# Altium PCB Game_Controller.PcbDoc
Units mm, origin at the board's own origin, x right, y up, seen from the top; angles counter-clockwise.
Board outline 125.68 x 44.82 mm, 2 copper layers (Top Layer, Bottom Layer); 110 components, 52 nets, 298 pads, 85 vias.
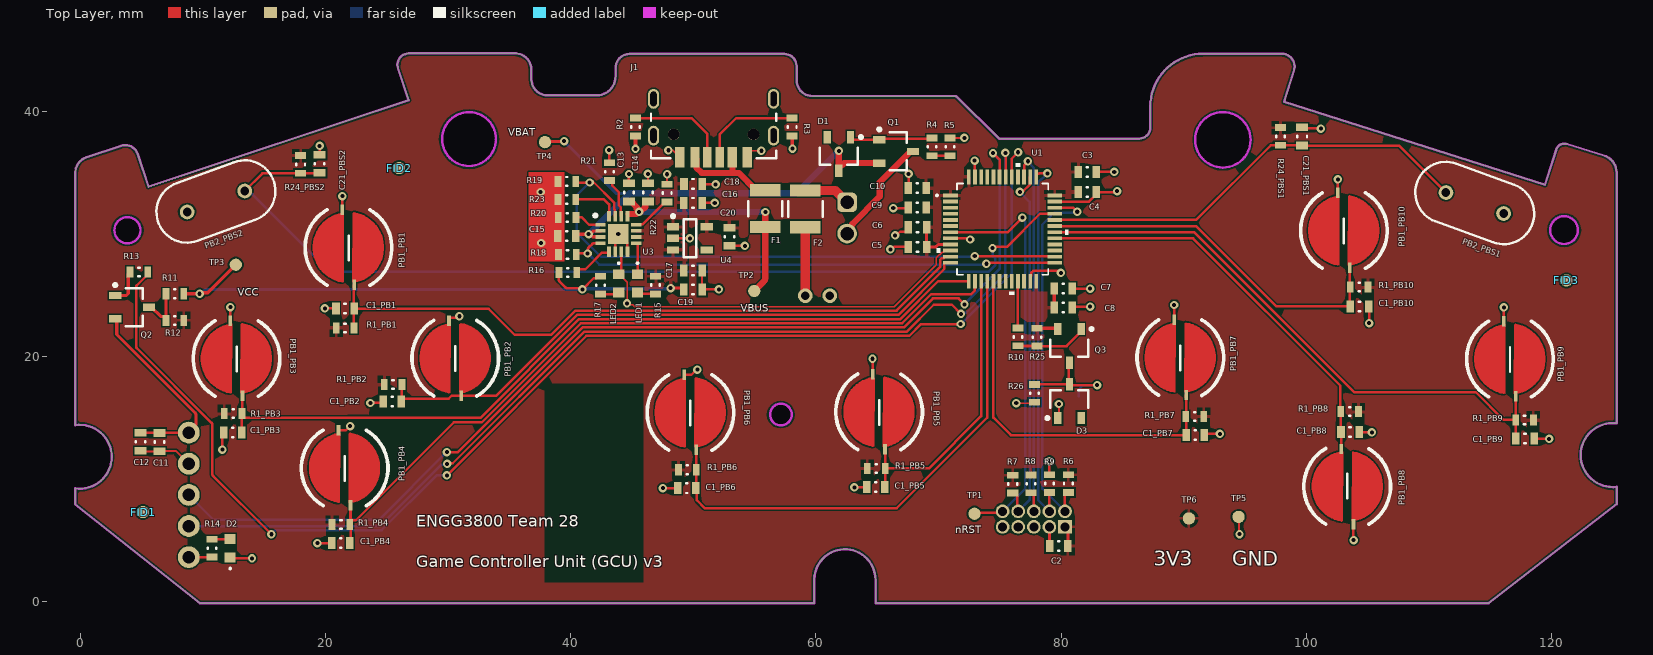
[diagram p0: Top Layer view]
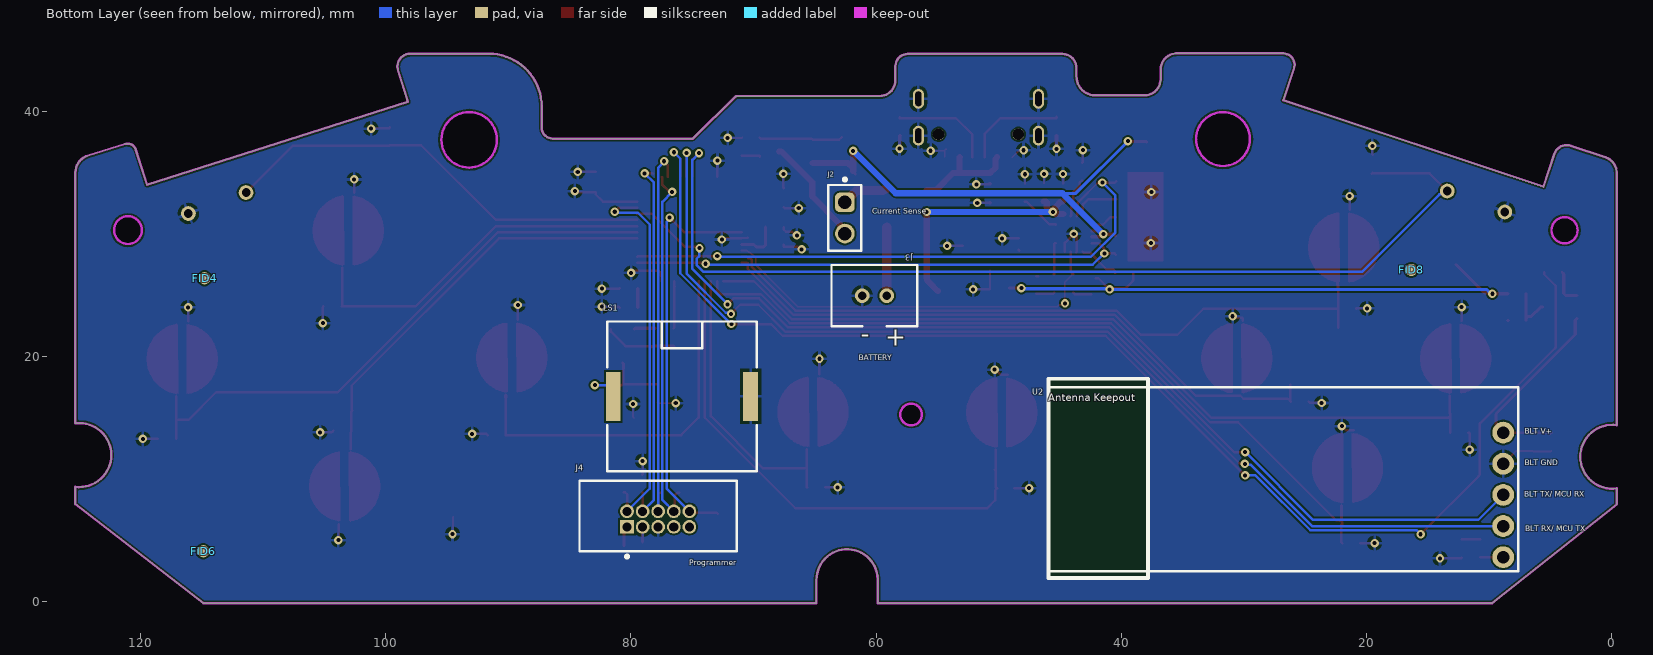
[diagram p1: Bottom Layer view, seen from below]
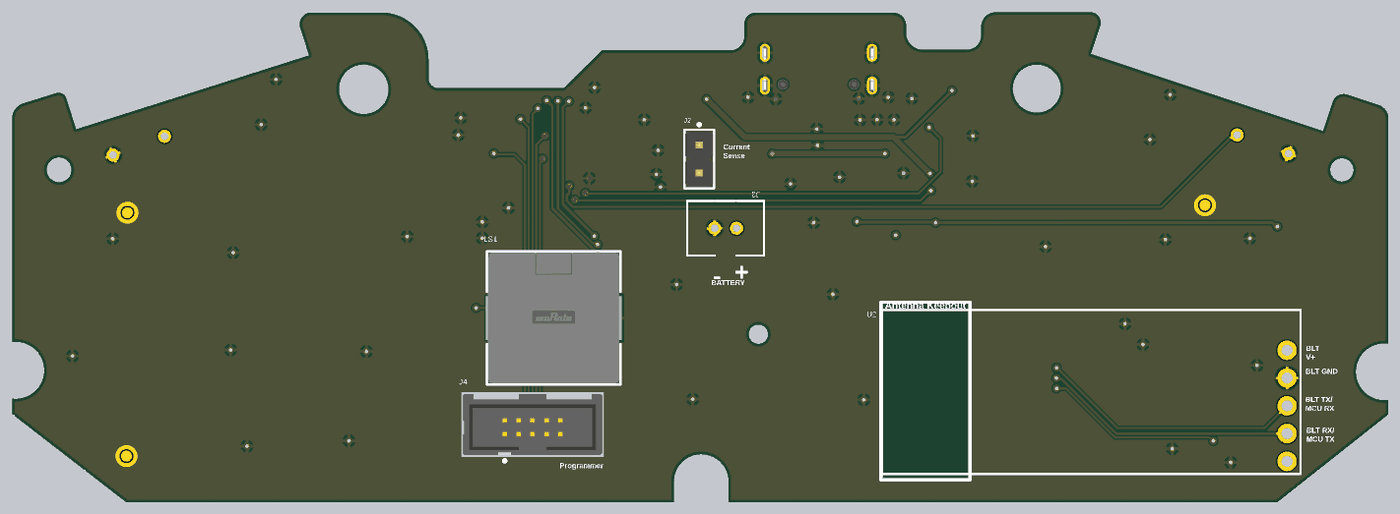
[diagram p2: 3D render of the assembled board from below, using the file's embedded part models]

## Layer stack, top to bottom
Top Solder: solder mask 0.0102, Solder Resist, Dk 3.5
Top Layer: signal copper 0.0356
Dielectric 1: dielectric 0.32, FR-4, Dk 4.8
Bottom Layer: signal copper 0.0356
Bottom Solder: solder mask 0.0102, Solder Resist, Dk 3.5

## Board outline
-0.382,7.932 -0.382,9.245 -0.373,9.251 ccw(c-0.015,11.823) 2.582,11.823 ccw(c-0.015,11.823) -0.373,14.395 -0.382,14.402 -0.382,34.989 -0.382,34.99 cw(c0.934,34.989) 0.519,36.238 3.367,37.183 cw(c3.699,36.182) 4.7,36.514 5.583,33.856 26.786,40.895 25.927,43.483 cw(c26.818,43.779) 26.818,44.718 35.478,44.718 cw(c35.478,43.391) 36.805,43.391 36.805,42.611 ccw(c38.123,42.611) 38.123,41.292 42.125,41.292 ccw(c42.125,42.83) 43.662,42.83 43.662,43.515 cw(c44.817,43.515) 44.817,44.67 57.429,44.67 cw(c57.429,43.668) 58.43,43.668 58.43,42.518 ccw(c59.709,42.518) 59.709,41.24 71.414,41.24 71.419,41.238 74.946,37.77 86.365,37.77 ccw(c86.365,38.676) 87.271,38.676 87.271,40.379 cw(c91.583,40.379) 91.583,44.691 97.984,44.691 cw(c97.984,43.639) 99.037,43.639 cw(c97.984,43.639) 98.987,43.321 98.177,40.77 119.453,34.01 120.358,36.857 cw(c121.047,36.639) 121.263,37.328 124.264,36.387 cw(c123.824,34.984) 125.295,34.985 125.296,34.984 125.296,14.559 125.286,14.553 ccw(c124.973,11.964) 125.287,9.374 125.296,9.368 125.296,7.975 125.292,7.969 114.868,-0.104 114.863,-0.106 64.87,-0.106 64.863,-0.098 64.863,1.794 ccw(c62.366,1.786) 59.87,1.851 59.87,-0.098 59.864,-0.106 9.765,-0.106 9.76,-0.103
cut-out: 90.923,37.669 ccw(c93.187,37.669) 93.187,35.405 ccw(c93.187,37.669) 95.451,37.669 ccw(c93.187,37.669) 93.187,39.933 ccw(c93.187,37.669)
cut-out: 119.878,30.303 ccw(c121.01,30.303) 121.01,29.171 ccw(c121.01,30.303) 122.142,30.303 ccw(c121.01,30.303) 121.01,31.435 ccw(c121.01,30.303)
cut-out: 2.799,30.293 ccw(c3.865,30.293) 3.865,29.227 ccw(c3.865,30.293) 4.93,30.293 ccw(c3.865,30.293) 3.865,31.358 ccw(c3.865,30.293)
cut-out: 56.263,15.264 ccw(c57.146,15.264) 57.146,14.381 ccw(c57.146,15.264) 58.029,15.264 ccw(c57.146,15.264) 57.146,16.147 ccw(c57.146,15.264)
cut-out: 29.521,37.73 ccw(c31.718,37.73) 31.718,35.533 ccw(c31.718,37.73) 33.916,37.73 ccw(c31.718,37.73) 31.718,39.928 ccw(c31.718,37.73)

## Design rules (kind name [scope] priority, off if disabled: settings)
Clearance [All] p1: gap=0.14 ignorepadtopadclearanceinfootprint=FALSE
MinimumSolderMaskSliver [All] p1: minsoldermaskwidth=0.102
NetAntennae [NOT(InComponent('PB1_PB1') OR InComponent('PB1_PB2') OR InComponent('PB1_PB3') OR InComponent('PB1_PB4') OR InComponent('PB1_PB5') OR InComponent('PB1_PB6') OR InComponent('PB1_PB7') OR InComponent('PB1_PB8') OR InComponent('PB1_PB9') OR InComponent('PB1_PB10') OR InComponent('PB3_PBS1') OR InComponent('PB3_PBS2'))] p1: netantennaetolerance=0
PolygonConnect [All] p1: connectstyle=Relief reliefconductorwidth=0.254 reliefentries=4 polygonreliefangle="90 Angle" airgapwidth=0.254
RoutingVias [All] p1: holewidth=0.33 width=0.686 viastyle="Through Hole" minholewidth=0.33 minwidth=0.686 maxholewidth=0.33 maxwidth=0.686
SolderMaskExpansion SolderMaskExpansionViaTent [IsVia] p1: expansion=0.102 istentingtop=TRUE
SolderMaskExpansion [All] p2: expansion=0.102 istentingtop=FALSE
SupplyNets "Schematic Supply Nets_4" [InNet('+3V3')] p1: voltage=0.000
SupplyNets "Schematic Supply Nets_3" [InNet('V_BAT')] p2: voltage=0.000
SupplyNets "Schematic Supply Nets_2" [InNet('GND')] p3: voltage=0.000
SupplyNets "Schematic Supply Nets_1" [InNet('V_BUS')] p4: voltage=0.000
SupplyNets "Schematic Supply Nets" [InNet('VCC')] p5: voltage=0.000
Width [All] p1: maxlimit=2.54 minlimit=0.152 preferedwidth=0.203
28 further rules are at their usual default settings.

## Classes and differential pairs
component class Buzzer: D3 LS1 Q3 R25 R26
channel class SNES_Shoulder_Button: PBS1 PBS2
net class SNES_AUX_PB[1..2]: SNES_AUX_PB1 SNES_AUX_PB2
component class PBS2: C21_PBS2 PB2_PBS2 R24_PBS2
component class PBS1: C21_PBS1 PB2_PBS1 R24_PBS1
component class Control: C2 C3 C4 C5 C6 C7 C8 C9 C10 J4 R6 R7 R8 R9 R10 TP1 U1
component class Charger: C13 C14 C15 C16 C17 C18 C19 C20 LED1 LED2 R15 R16 R17 R18 R19 R20 R21 R22 R23 TP2 TP3 TP4 TP5 TP6 U3 U4
component class Bluetooth: C11 C12 D2 Q2 R11 R12 R13 R14 U2
channel class Push_Button: PB1 PB2 PB3 PB4 PB5 PB6 PB7 PB8 PB9 PB10
net class SNES_PB[1..10]: SNES_PB1 SNES_PB2 SNES_PB3 SNES_PB4 SNES_PB5 SNES_PB6 SNES_PB7 SNES_PB8 SNES_PB9 SNES_PB10
component class PB10: C1_PB10 PB1_PB10 R1_PB10
component class PB9: C1_PB9 PB1_PB9 R1_PB9
component class PB8: C1_PB8 PB1_PB8 R1_PB8
component class PB7: C1_PB7 PB1_PB7 R1_PB7
component class PB6: C1_PB6 PB1_PB6 R1_PB6
component class PB5: C1_PB5 PB1_PB5 R1_PB5
component class PB4: C1_PB4 PB1_PB4 R1_PB4
component class PB3: C1_PB3 PB1_PB3 R1_PB3
component class PB2: C1_PB2 PB1_PB2 R1_PB2
component class PB1: C1_PB1 PB1_PB1 R1_PB1
component class Game_Controller: D1 F1 F2 FID1 FID2 FID3 FID6 J1 J2 J3 Q1 R2 R3 R4 R5

## Components (designator, comment, footprint, x,y, rotation, side; value= is the part's Value field where it differs from the comment)
C1_PB1 "0.1 uF ± 5% / 50V X7R  / 0603" 0603_CAP 21.609,23.898 r180 top (schematic designator C1)
C1_PB2 "0.1 uF ± 5% / 50V X7R  / 0603" 0603_CAP 25.468,16.315 r180 top (schematic designator C1)
C1_PB3 "0.1 uF ± 5% / 50V X7R  / 0603" 0603_CAP 12.447,13.798 r180 top (schematic designator C1)
C1_PB4 "0.1 uF ± 5% / 50V X7R  / 0603" 0603_CAP 21.258,4.784 r180 top (schematic designator C1)
C1_PB5 "0.1 uF ± 5% / 50V X7R  / 0603" 0603_CAP 64.892,9.343 r180 top (schematic designator C1)
C1_PB6 "0.1 uF ± 5% / 50V X7R  / 0603" 0603_CAP 49.471,9.258 r180 top (schematic designator C1)
C1_PB7 "0.1 uF ± 5% / 50V X7R  / 0603" 0603_CAP 90.934,13.588 r0 top (schematic designator C1)
C1_PB8 "0.1 uF ± 5% / 50V X7R  / 0603" 0603_CAP 103.559,13.845 r0 top (schematic designator C1)
C1_PB9 "0.1 uF ± 5% / 50V X7R  / 0603" 0603_CAP 117.822,13.302 r0 top (schematic designator C1)
C1_PB10 "0.1 uF ± 5% / 50V X7R  / 0603" 0603_CAP 104.328,24.077 r0 top (schematic designator C1)
C2 "1 uF ± 10%  / 16V X7R  / 0603" 0603_CAP 79.803,4.551 r180 top
C3 "0.1 uF ± 5% / 50V X7R  / 0603" 0603_CAP 82.134,35.059 r0 top
C4 "0.1 uF ± 5% / 50V X7R  / 0603" 0603_CAP 82.134,33.408 r0 top
C5 "0.1 uF ± 5% / 50V X7R  / 0603" 0603_CAP 68.287,28.938 r180 top
C6 "1 uF ± 10%  / 16V X7R  / 0603" 0603_CAP 68.287,30.538 r180 top
C7 "0.1 uF ± 5% / 50V X7R  / 0603" 0603_CAP 80.178,25.559 r0 top
C8 "4.7 uF ± 10%  / 10V X5R  / 0603" 0603_CAP 80.178,23.985 r0 top
C9 "0.1 uF ± 5% / 50V X7R  / 0603" 0603_CAP 68.265,32.163 r180 top
C10 "4.7 uF ± 10%  / 10V X5R  / 0603" 0603_CAP 68.265,33.738 r180 top
C11 "0.1 uF ± 5% / 50V X7R  / 0603" 0603_CAP 6.471,13.021 r270 top
C12 "1 uF ± 10%  / 16V X7R  / 0603" 0603_CAP 4.928,13.05 r270 top
C13 "0.1 uF ± 5% / 50V X7R  / 0603" 0603_CAP 44.752,33.379 r90 top
C14 "1 uF ± 10%  / 16V X7R  / 0603" 0603_CAP 46.327,33.376 r90 top
C15 "4.7 uF ± 10%  / 10V X5R  / 0603" 0603_CAP 39.696,29.816 r180 top
C16 "4.7 uF ± 10%  / 10V X5R  / 0603" 0603_CAP 49.983,32.533 r0 top
C17 "0.1 uF ± 5% / 50V X7R  / 0603" 0603_CAP 49.983,27.022 r0 top
C18 "10 uF ± 20%  / 10V X5R  / 0603" 0603_CAP 49.983,34.083 r0 top
C19 "10 uF ± 20%  / 10V X5R  / 0603" 0603_CAP 49.983,25.472 r0 top
C20 "4.7 uF ± 10%  / 10V X5R  / 0603" 0603_CAP 52.955,29.765 r270 top
C21_PBS1 "0.1 uF ± 5% / 50V X7R  / 0603" 0603_CAP 99.656,37.941 r90 top (schematic designator C21)
C21_PBS2 "0.1 uF ± 5% / 50V X7R  / 0603" 0603_CAP 19.518,35.708 r90 top (schematic designator C21)
D1 "5.6V Zener Diode" SOT23-3 61.873,36.511 r270 top
D2 "LED GREEN" LED 12.423,4.157 r270 top
D3 "5.6V Zener Diode" SOT23-3 80.678,16.354 r90 top
F1 "1210L050YR" FP-1210L050YR-MFG 55.87,32.053 r270 top
F2 "1210L050YR" FP-1210L050YR-MFG 59.144,32.032 r90 top
FID1 "FID" Fiducial#1 5.161,7.311 r90 top
FID2 "FID" Fiducial#1 26.041,35.361 r90 top
FID3 "FID" Fiducial#1 121.229,26.204 r90 top
FID4 "FID" Fiducial#2 114.789,26.383 r90 top
FID6 "FID" Fiducial#2 114.879,4.115 r90 top
FID8 "FID" Fiducial#2 16.387,27.061 r90 top (schematic designator FID6)
J1 "217176-0001" FP-217176-0001-MFG 51.658,40.182 r180 top
J2 "61300211121" 61300211121 62.551,31.294 r270 bottom
J3 "Molex Connector" B2B-PH-K-S 59.139,24.96 r0 bottom
J4 "10 Pin Header" SHF-105-01-L-D-TH 78.532,7.633 r180 bottom
LED1 "LED GREEN" LED 45.284,26.163 r90 top
LED2 "LED RED" LED 43.75,26.163 r90 top
LS1 "PKLCS1212E2000-R1" FP-PKLCS1212E2000-R1-MFG 75.837,16.754 r180 bottom
PB1_PB1 "NES Pushbutton" SNES_PB 21.893,28.906 r0 top (schematic designator PB1)
PB1_PB2 "NES Pushbutton" SNES_PB 30.602,19.88 r0 top (schematic designator PB1)
PB1_PB3 "NES Pushbutton" SNES_PB 12.769,19.857 r0 top (schematic designator PB1)
PB1_PB4 "NES Pushbutton" SNES_PB 21.582,10.934 r0 top (schematic designator PB1)
PB1_PB5 "NES Pushbutton" SNES_PB 65.163,15.508 r0 top (schematic designator PB1)
PB1_PB6 "NES Pushbutton" SNES_PB 49.772,15.452 r0 top (schematic designator PB1)
PB1_PB7 "NES Pushbutton" SNES_PB 89.723,19.93 r0 top (schematic designator PB1)
PB1_PB8 "NES Pushbutton" SNES_PB 103.319,9.385 r180 top (schematic designator PB1)
PB1_PB9 "NES Pushbutton" SNES_PB 116.6,19.817 r0 top (schematic designator PB1)
PB1_PB10 "NES Pushbutton" SNES_PB 103.062,30.29 r0 top (schematic designator PB1)
PB2_PBS1 "NES  Shoulder Pushbutton" SHOULDER_PB 116.075,31.659 r160 top (schematic designator PB2)
PB2_PBS2 "NES  Shoulder Pushbutton" SHOULDER_PB 8.731,31.784 r20 top (schematic designator PB2)
Q1 "P Channel MOSFET" SOT23-3 66.547,36.72 r0 top
Q2 "P Channel MOSFET" SOT23-3 4.246,24.026 r0 top
Q3 "P Channel MOSFET" SOT23-3 80.676,20.858 r270 top
R1_PB1 "10k ± 0.5% / 100 mW  / 0603" 0603_RES 21.609,22.324 r180 top (schematic designator R1)
R1_PB2 "10k ± 0.5% / 100 mW  / 0603" 0603_RES 25.525,17.712 r180 top (schematic designator R1)
R1_PB3 "10k ± 0.5% / 100 mW  / 0603" 0603_RES 12.48,15.342 r180 top (schematic designator R1)
R1_PB4 "10k ± 0.5% / 100 mW  / 0603" 0603_RES 21.274,6.296 r180 top (schematic designator R1)
R1_PB5 "10k ± 0.5% / 100 mW  / 0603" 0603_RES 64.923,10.878 r180 top (schematic designator R1)
R1_PB6 "10k ± 0.5% / 100 mW  / 0603" 0603_RES 49.521,10.766 r180 top (schematic designator R1)
R1_PB7 "10k ± 0.5% / 100 mW  / 0603" 0603_RES 90.894,15.112 r0 top (schematic designator R1)
R1_PB8 "10k ± 0.5% / 100 mW  / 0603" 0603_RES 103.521,15.501 r0 top (schematic designator R1)
R1_PB9 "10k ± 0.5% / 100 mW  / 0603" 0603_RES 117.785,14.826 r0 top (schematic designator R1)
R1_PB10 "10k ± 0.5% / 100 mW  / 0603" 0603_RES 104.295,25.655 r0 top (schematic designator R1)
R2 "5.1k ± 1% / 100 mW  / 0603" 0603_RES 45.298,38.712 r90 top
R3 "5.1k ± 1% / 100 mW  / 0603" 0603_RES 58.072,38.712 r90 top
R4 "46.4k ± 0.1% / 100 mW  / 0603" 0603_RES 69.477,37.096 r270 top
R5 "46.4k ± 0.1% / 100 mW  / 0603" 0603_RES 70.95,37.096 r90 top
R6 "10k ± 0.5% / 100 mW  / 0603" 0603_RES 80.584,9.639 r90 top
R7 "10k ± 0.5% / 100 mW  / 0603" 0603_RES 76.054,9.601 r90 top
R8 "10k ± 0.5% / 100 mW  / 0603" 0603_RES 77.536,9.614 r90 top
R9 "10k ± 0.5% / 100 mW  / 0603" 0603_RES 79.06,9.639 r270 top
R10 "1.13k ± 1% / 100 mW  / 0603" 0603_RES 76.496,21.592 r90 top
R11 "0R ± 1% / 25 mW  / 0204" 0603_RES 7.727,25.116 r0 top
R12 "0R ± 1% / 25 mW  / 0204" 0603_RES 7.727,22.948 r0 top
R13 "1.13k ± 1% / 100 mW  / 0603" 0603_RES 4.805,26.881 r0 top
R14 "1.13k ± 1% / 100 mW  / 0603" 0603_RES 10.747,4.371 r270 top
R15 "1.13k ± 1% / 100 mW  / 0603" 0603_RES 46.938,25.828 r270 top
R16 "10k ± 0.5% / 100 mW  / 0603" 0603_RES 39.772,26.844 r0 top
R17 "1.13k ± 1% / 100 mW  / 0603" 0603_RES 42.443,25.816 r270 top
R18 "10k ± 0.5% / 100 mW  / 0603" 0603_RES 39.746,28.311 r0 top
R19 "10k ± 0.5% / 100 mW  / 0603" 0603_RES 39.696,34.286 r0 top
R20 "10k ± 0.5% / 100 mW  / 0603" 0603_RES 39.722,31.34 r0 top
R21 "46.4k ± 0.1% / 100 mW  / 0603" 0603_RES 43.178,35.071 r90 top
R22 "1.18k ± 1% / 100 mW  / 0603" 0603_RES 47.876,33.325 r270 top
R23 "1.13k ± 1% / 100 mW  / 0603" 0603_RES 39.696,32.813 r0 top
R24_PBS1 "10k ± 0.5% / 100 mW  / 0603" 0603_RES 97.878,37.941 r90 top (schematic designator R24)
R24_PBS2 "10k ± 0.5% / 100 mW  / 0603" 0603_RES 17.996,35.661 r90 top (schematic designator R24)
R25 "10k ± 0.5% / 100 mW  / 0603" 0603_RES 78.045,21.574 r90 top
R26 "1.13k ± 1% / 100 mW  / 0603" 0603_RES 77.822,16.996 r270 top
TP1 "TEST POINT" "New footprint 1" 72.931,7.179 r90 top
TP2 "TEST POINT" "New footprint 1" 54.98,25.337 r90 top
TP3 "TEST POINT" "New footprint 1" 12.704,27.483 r90 top
TP4 "TEST POINT" "New footprint 1" 37.909,37.479 r90 top
TP5 "TEST POINT" "New footprint 1" 94.468,6.921 r90 top
TP6 "TEST POINT" "New footprint 1" 90.418,6.796 r90 top
U1 "STM32 Ultra Low Power MCU" LQFP48-7x7mm 75.733,30.258 r0 top locked
U2 "HC05" HC05 8.867,3.635 r90 bottom locked
U3 "Battery Management System" BQ24074RGTR 43.826,29.71 r0 top
U4 "IC REG LINEAR 3.3V 500MA" SOT23-5 49.729,29.638 r0 top

## Footprints (in the part's own frame and the unit in brackets; to place one, negate y for a bottom-side part, rotate by r counter-clockwise, add the part's x,y. Pads: shape width x height; smd on the part's side, far side on the other; paste and mask are expansions set on the pad)
0603_CAP [mm] "Chip Capacitor, 2-Leads, Body 1.55x0.85mm, IPC Medium Density"
  rect 0.62x0.98 smd: 1(-0.74,0) 2(0.74,0)
  silkscreen extent -0.05,-0.39 0.05,0.39, body extent -0.8,-0.45 0.8,0.45, height 0.55
0603_RES [mm] "Chip Resistor, 2-Leads, Body 1.55x0.85mm, IPC Medium Density"
  rect 0.55x0.9 smd: 1(-0.725,0) 2(0.725,0)
  silkscreen extent -0.05,-0.35 0.05,0.35, body extent -0.8,-0.45 0.8,0.45, height 0.55
61300211121 [mm] "Pin Header, pitch 2.54 mm, THT, Vertical, single row, 2p"
  rrect50% 1.6x1.6 hole 1.1: 1(-1.27,0)
  round 1.6 hole 1.1: 2(1.27,0)
  silkscreen extent -3.26,-1.35 2.69,1.35, body extent -2.54,-1.27 2.54,1.27, height 8.57
B2B-PH-K-S [mm]
  round 1.2 hole 0.7: 1(0,0) 2(2,0)
  silkscreen extent -2.5,-2.5 4.5,2.5
BQ24074RGTR [mm]
  rect 0.85x0.3 smd: 1(-1.389,1.033) 2(-1.389,0.533) 3(-1.389,0.033) 4(-1.389,-0.467) 9(1.511,-0.467) 10(1.511,0.033) 11(1.511,0.533) 12(1.511,1.033)
  rect 0.3x0.85 smd: 5(-0.689,-1.167) 6(-0.189,-1.167) 7(0.311,-1.167) 8(0.811,-1.167) 13(0.811,1.733) 14(0.311,1.733) 15(-0.189,1.733) 16(-0.689,1.733)
  rect 1.65x1.65 smd: 17(0.061,0.283)
  silkscreen extent -1.94,1.66 -1.69,1.91
Fiducial#1 [mm]
  round 1 smd paste-2539.97 mask-2539.97: 4(0,0.025)
Fiducial#2 [mm]
  round 1 smd far side paste-2539.97 mask-2539.97: 4(0,0.025)
FP-1210L050YR-MFG [mm]
  rect 1x2.5 smd paste+0 mask+0: 1(-1.5,0) 2(1.5,0)
  silkscreen extent -0.63,-1.4 0.63,1.4, body extent -1.61,-1.29 1.61,1.29, height 0.85
FP-217176-0001-MFG [mm]
  rrect100% 0.92x1.62 hole 1.2 slot 0.5 at 0 deg paste-2539.97 mask+0: 1(-4.895,2.175) 2(4.895,2.175) 3(-4.895,-0.825) 4(4.895,-0.825)
  rect 0.8x1.67 smd paste+0 mask+0: C1(-2.75,3.94) C6(2.75,3.94)
  rect 0.76x1.67 smd paste+0 mask+0: C2(-1.52,3.94) C5(1.52,3.94)
  rect 0.7x1.67 smd paste+0 mask+0: C3(-0.5,3.94) C4(0.5,3.94)
  round 0.95 hole 0.95 unplated paste-2539.97 mask+0: ""(-3.25,2.075) ""(3.25,2.075)
  silkscreen extent -5.1,0.4 5.1,4.02, body extent -5.32,-4.34 5.32,4.42, height 4.81
FP-PKLCS1212E2000-R1-MFG [mm]
  rect 1.2x4 smd paste+0 mask+0: 1(-5.6,0) 2(5.6,0)
  silkscreen extent -6.1,-6.1 6.1,6.1, body extent -6,-6 6,6, height 3.01
HC05 [mil]
  round 70 hole 40.16: 1(0,0) 2(100,0) 3(200,0) 4(300,0) 5(400,0)
  silkscreen extent -45,-48 545,1457
LED [mm]
  rect 0.8x0.9 smd: 1(-0.954,-0.178) 2(0.548,-0.178)
  silkscreen extent 1.42,-0.2 1.47,-0.15, body extent -1,-0.58 0.6,0.22, height 0.55
LQFP48-7x7mm [mil]
  rect 47x12 smd paste+0 mask+0: 1(-187.32,113.27) 2(-187.32,93.58) 3(-187.32,73.9) 4(-187.32,54.21) 5(-187.32,34.53) 6(-187.32,14.84) 7(-187.32,-4.84) 8(-187.32,-24.53) 9(-187.32,-44.21) 10(-187.32,-63.9) 11(-187.32,-83.58) 12(-187.32,-103.27) 25(147.32,-103.27) 26(147.32,-83.58) 27(147.32,-63.9) 28(147.32,-44.21) 29(147.32,-24.53) 30(147.32,-4.84) 31(147.32,14.84) 32(147.32,34.53) 33(147.32,54.21) 34(147.32,73.9) 35(147.32,93.58) 36(147.32,113.27)
  rect 12x47 smd paste+0 mask+0: 13(-128.27,-162.32) 14(-108.58,-162.32) 15(-88.9,-162.32) 16(-69.21,-162.32) 17(-49.53,-162.32) 18(-29.84,-162.32) 19(-10.16,-162.32) 20(9.53,-162.32) 21(29.21,-162.32) 22(48.9,-162.32) 23(68.58,-162.32) 24(88.27,-162.32) 37(88.27,172.32) 38(68.58,172.32) 39(48.9,172.32) 40(29.21,172.32) 41(9.53,172.32) 42(-10.16,172.32) 43(-29.84,172.32) 44(-49.53,172.32) 45(-69.21,172.32) 46(-88.9,172.32) 47(-108.58,172.32) 48(-128.27,172.32)
  silkscreen extent -234,-206 191,216, body extent -197,-172 157,182, height 63
"New footprint 1" [mm]
  round 1 smd: 0(0,0)
SHF-105-01-L-D-TH [mm]
  rect 1.12x1.12 hole 0.74 paste-2539.97 mask+0: 1(-1.778,-1.525)
  round 1.12 hole 0.74 paste-2539.97 mask+0: 2(-1.778,-0.255) 3(-0.508,-1.525) 4(-0.508,-0.255) 5(0.762,-1.525) 6(0.762,-0.255) 7(2.032,-1.525) 8(2.032,-0.255) 9(3.302,-1.525) 10(3.302,-0.255)
  silkscreen extent -5.65,-4.07 7.18,2.22, body extent -5.59,-3.43 7.11,2.16, height 5.46
SHOULDER_PB [mm]
  round 1.2 hole 0.7: 1(0,0) 2(5,0)
  silkscreen extent -2.5,-2.5 7.5,2.5
SNES_PB [mm]
  rect 0.3x0.85 smd: 1(-0.514,3.05) 2(0.477,-3.071)
  Top Layer region: -0.401,-2.841 -1.321,-2.509 -2.197,-1.839 -2.743,-0.722 -2.826,0.143 -2.708,0.872 -2.173,1.803 -1.733,2.2 -0.373,2.797
  Top Layer region: 0.338,2.762 1.233,2.438 2.109,1.768 2.655,0.652 2.738,-0.214 2.62,-0.942 2.085,-1.874 1.645,-2.271 0.31,-2.857
  Top Layer lines w0.203: -0.518,-2.781 cw(c-0.031,-0.023) -0.518,2.734
  Top Layer lines w0.254: 0.455,-2.781 ccw(c-0.031,-0.023) 0.455,2.734
  silkscreen extent -3.53,-3.11 3.53,3.06
SOT23-3 [mm] "SOT23, 3-Leads, Body 2.90x2.80mm, Pitch 0.95mm, IPC Medium Density"
  rect 1x0.6 smd: 1(-1.375,0.95) 2(-1.375,-0.95) 3(1.375,0)
  silkscreen extent -1.5,-1.55 0.87,1.93, body extent -0.88,-1.52 0.87,1.53, height 1.45
SOT23-5 [mm] "SOT23, 5-Leads, Body 2.90x2.80mm, Pitch 0.95mm, IPC Medium Density"
  rect 1x0.6 smd: 1(-1.375,0.95) 2(-1.375,0) 3(-1.375,-0.95) 4(1.375,-0.95) 5(1.375,0.95)
  silkscreen extent -1.5,-1.55 0.5,1.92, body extent -0.88,-1.52 0.87,1.53, height 1.45

## Part data
C1_PB1 C1_PB2 C1_PB3 C1_PB4 C1_PB5 C1_PB6 C1_PB7 C1_PB8 C1_PB9 C1_PB10 C3 C4 C5 C7 C9 C11 C13 C17 C21_PBS1 C21_PBS2: library part 3, Manufacturer=Yageo, Manufacturer Part Number=CC0603JRX7R9BB104, CID=3
C2 C6 C12 C14: library part 5, Manufacturer=Yageo, Manufacturer Part Number=GXT188R71C105KE13D, CID=5
C8 C10 C15 C16 C20: library part 8, Manufacturer=Yageo, Manufacturer Part Number=CC0603KPX5R6BB475, CID=8
C18 C19: library part 14, Manufacturer=Murata, Manufacturer Part Number=GRM188R61A106ME69D, CID=14
D1 D3: library part 29, Manufacturer=Vishay, Manufacturer Part Number=BZX84C5V6-E3-08, CID=29
D2 LED1: library part 11, Manufacturer=Lite-ON, Manufacturer Part Number=LTST-C190GKT, CID=11
F1 F2: library part CMP-08606-000067-1, "PTC RESET FUSE 13.2V 500MA 1210", Case Code (Imperial)=1210, Case Code (Metric)=3225, Current Rating=100A, Hold Current=500mA, Max Operating Temperature=85°C, Max Power Dissipation=600mW, Max Voltage Rating (DC)=13.2V, Min Operating Temperature=-40°C, Package Quantity=4000, Resistance=900mR, Trip Current=1A, Approvals=cULus, Case/Package=1210, Height=0.85mm, Lead Free="Lead Free", Length=3.43mm, Max Current Rating=100A, Operating Supply Voltage=13.2V, Packaging="Tape and Reel", Power Dissipation=600mW, REACH SVHC="No SVHC", Terminal Material=Copper, Termination=SMD/SMT, Time to Trip=0.1s, Voltage Rating=13.2V, Voltage Rating (DC)=13.2V, Width=2.8mm, Working Voltage=13.2V
J1: library part CMP-04767-000013-1, "CONN RCPT TYPE C 24POS SMD RA"
J2: library part CMP-1712-00002-7, "THT Vertical Pin Header WR-PHD, Pitch 2.54 mm, Single Row, 2 pins", Color=Black, Contact Resistance=20mΩ, Current Rating=3A, Max Operating Temperature=105°C, Min Operating Temperature=-40°C, Operating Supply Voltage=250V, Connector Type="Male Pin", Contact Gender=Male, Contact Material=Gold, Contact Mating Length=5.9944mm, Contact Plating=Gold, Gender=Male, Height=8.94mm, Housing Material=PBT, Lead Free="Lead Free", Lead Pitch=2.54mm, Mount="Through Hole", Number of Contacts=2, Number of Pins=2, Number of Positions=2, Number of Rows=1, Orientation=Vertical, Packaging=Bulk, Pitch=2.54mm, REACH SVHC=No, RoHS=Compliant, Termination="Through Hole", Voltage Rating=250V
J3: library part 18, Manufacturer=Molex, Manufacturer Part Number=B2B-PH-K-S, CID=18
J4: library part 26, Manufacturer=Samtec, Manufacturer Part Number=SHF-105-01-L-D-TH, CID=26
LED2: library part 12, Manufacturer=Lite-ON, Manufacturer Part Number=LTST-C190KRKT, CID=12
LS1: library part CMP-06202-000001-1, "AUDIO PIEZO TRANSDUCER 12.5V SMD", Frequency=2kHz, Manufacturer=Murata, Operating Supply Voltage=12.5V, Temperature="-20°C to +70°C", Temperature Range High=+70°C, Temperature Range Low=-20°C, Automotive=No, Category=Speak, ComponentLink2Description=Datasheet, ComponentLink2URL=https://www.murata.com/en-global/products/productdata/8801054425118/SPEC-PKLCS1212E2000-R1.pdf?1517839212000, Device Class L1=Electromechanical, Device Class L2="Audio Products", Device Class L3=Buzzers, Digikey Description="AUDIO PIEZO TRANSDUCER 12.5V SMD", Height=3mm, Lead Free=Yes, Manufacturer Part Number=PKLCS1212E2000-R1, Mouser Description="Piezo buzzer SMD", Octopart=https://octopart.com/pklcs1212e2000-r1-murata-7123179, Package=PKLCS1212E2000-R1, RoHS=TRUE
PB1_PB1 PB1_PB2 PB1_PB3 PB1_PB4 PB1_PB5 PB1_PB6 PB1_PB7 PB1_PB8 PB1_PB9 PB1_PB10: library part 15, Manufacturer=Custom, CID=15, Manufacturer Part Number=Custom
PB2_PBS1 PB2_PBS2: library part 27, Manufacturer=Custom, CID=27, Manufacturer Part Number=Custom
Q1 Q2 Q3: library part 28, Manufacturer=Vishay, Manufacturer Part Number=SI2301CDS-T1-E3, CID=28
R1_PB1 R1_PB2 R1_PB3 R1_PB4 R1_PB5 R1_PB6 R1_PB7 R1_PB8 R1_PB9 R1_PB10 R6 R7 R8 R9 R16 R18 R19 R20 R24_PBS1 R24_PBS2 R25: library part 6, Manufacturer=Yageo, Manufacturer Part Number=AC0603DRE0710KL, CID=6
R2 R3: library part 17, Manufacturer=Bourns, Manufacturer Part Number=CR0603-FX-5101ELF, CID=17
R4 R5 R21: library part 7, Manufacturer=Yageo, Manufacturer Part Number=RT0603BRD0746K4L, CID=7
R10 R13 R14 R15 R17 R23 R26: library part 10, Manufacturer=Yageo, Manufacturer Part Number=RC0603FR-071K13L, CID=10
R11 R12: library part 24, Manufacturer=Vishay, Manufacturer Part Number=None, CID=24
R22: library part 9, Manufacturer=Yageo, Manufacturer Part Number=RC0603FR-071K18L, CID=9
TP1 TP2 TP3 TP4 TP5 TP6: library part CMP-008-000007-2, "1mm Test Point"
U1: library part 25, Manufacturer="ST Electronics", Manufacturer Part Number=STM32L433CCT6, CID=25
U2: library part 19, "HC05 Bluetooth Module", Manufacturer=ETSG, CID=19, Manufacturer Part Number=HC05
U3: library part 2, Manufacturer="Texas Instrument", Manufacturer Part Number=BQ24074RGTR, CID=2
U4: library part 13, Manufacturer="Texas Instrument", Manufacturer Part Number=TLV75533PDBVR, CID=13

## Via types
v1: diameter 0.686, hole 0.33, Top Layer to Bottom Layer, tented both sides, 85 vias

## Nets (pads, with @x,y where several pads share a name; then routed paths per layer and width w, separated by ;. In a path a pad name is that pad's centre, name@x,y a point inside that pad or via, vN(x,y) a via of type N, cw(c..) or ccw(c..) an arc to the next point about the centre after c; other vN are vias at no path point)
+3V3: C2.1 C3.1 C4.1 C5.1 C6.1 C7.1 C8.1 C9.1 C10.1 C20.1 J4.1 Q3.2 R1_PB1.2 R1_PB2.2 R1_PB3.2 R1_PB4.2 R1_PB5.2 R1_PB6.2 R1_PB7.2 R1_PB8.2 R1_PB9.2 R1_PB10.2 R6.2 R7.2 R8.2 R12.2 R24_PBS1.2 R24_PBS2.2 R25.2 TP6.0 U1.1 U1.9 U1.24 U1.36 U1.48 U4.5 | length 8.8
  Top Layer w0.254: R12.2 R12.2@8.527,22.948 ; C6.1 69.027,29.065 69.154,28.938 69.771,28.938 69.969,29.135 U1.9 ; R25.2 79.659,22.299 Q3.2 ; C8.1 C7.1 ; J4.1 80.31,5.969 80.185,5.843 80.374,5.843 80.543,5.675 C2.1
\u\R\S\T: J4.10 TP1.0 U1.7 | length 33.6
  Top Layer w0.203: U1.7 75.653,30.135 v1(76.836,31.319) ; TP1.0 73.031,7.278 75.131,7.278 J4.10
  Bottom Layer w0.203: J4.10 75.23,7.39 75.276,7.435 75.288,7.435 77.085,9.232 77.085,30.958 76.836,31.207 v1(76.836,31.319)
BLT_RX: U1.42 U2.2 | length 87.6
  Top Layer w0.2: v1(29.935,11.249) 29.983,11.298 30.396,11.298 41.127,22.03 67.429,22.03 69.615,24.215 71.092,24.215 v1(71.834,23.474) ; v1(75.454,36.602) 75.465,36.592 75.465,34.646 U1.42
  Bottom Layer w0.2: U2.2 24.454,6.175 29.436,11.157 29.842,11.157 v1(29.935,11.249) ; v1(71.834,23.474) 71.927,23.567 72.261,23.567 75.454,26.76 75.454,36.582 75.465,36.592 v1(75.454,36.602)
BLT_SLP: R13.2 U1.41 | length 107.9
  Top Layer w0.203: R13.2 5.53,26.706 4.625,25.802 ccw(c4.769,25.658) 4.607,25.78 ccw(c4.769,25.658) 4.566,25.658 4.566,20.824 ccw(c4.769,20.824) 4.625,20.681 10.728,14.578 cw(c10.584,14.435) 10.747,14.557 cw(c10.584,14.435) 10.787,14.435 10.787,10.408 ccw(c10.99,10.408) 10.847,10.264 v1(15.605,5.506) ; v1(29.918,10.31) 41.297,21.689 67.623,21.689 68.583,22.649 v1(71.808,22.649) ; U1.41 75.975,36.139 v1(76.49,36.654)
  Bottom Layer w0.203: v1(15.605,5.506) 15.697,5.506 15.783,5.592 15.783,5.684 15.932,5.833 24.596,5.833 29.072,10.31 v1(29.918,10.31) ; v1(71.808,22.649) 71.835,22.649 75.975,26.789 75.975,36.139 v1(76.49,36.654)
BLT_TX: U1.43 U2.3 | length 87.7
  Top Layer w0.203: v1(29.917,12.196) 30.811,12.196 40.986,22.371 67.178,22.371 69.54,24.732 71.635,24.732 v1(72.119,24.248) ; v1(74.444,36.576) 74.975,36.046 U1.43
  Bottom Layer w0.203: U2.3 10.9,6.682 24.364,6.682 29.878,12.196 v1(29.917,12.196) ; v1(72.119,24.248) 72.119,24.279 74.989,27.149 74.989,36.032 v1(74.444,36.576)
BUZZER_PWM: R10.2 U1.21 | length 3.9
  Top Layer w0.203: U1.21 76.475,25.789 76.424,25.738 76.475,25.687 76.475,22.339 R10.2
CHRG_C\E\: R18.2 U1.25 U3.4 | length 41.1
  Top Layer w0.203: R18.2 40.56,28.4 v1(41.395,28.4) 41.41,28.415 41.41,28.728 cw(c41.613,28.728) 41.469,28.871 41.783,29.184 cw(c41.926,29.04) 41.926,29.243 U3.4 ; v1(73.896,27.563) 73.969,27.635 U1.25
  Bottom Layer w0.203: v1(41.395,28.4) 41.425,28.4 42.336,27.489 73.823,27.489 v1(73.896,27.563)
CHRG_TD: R19.2 U1.26 U3.15 | length 49.1
  Top Layer w0.203: R19.2 40.523,34.184 v1(41.55,34.184) ; v1@41.804,34.286 43.575,32.515 43.575,32.021 43.589,32.008 43.589,31.492 U3.15 ; v1(72.956,28.182) 72.98,28.159 79.452,28.159 U1.26
  Bottom Layer w0.203: v1(41.55,34.184) 40.496,33.13 40.496,30.125 42.486,28.135 72.91,28.135 v1(72.956,28.182)
GND: C1_PB1.2 C1_PB2.2 C1_PB3.2 C1_PB4.2 C1_PB5.2 C1_PB6.2 C1_PB7.2 C1_PB8.2 C1_PB9.2 C1_PB10.2 C2.2 C3.2 C4.2 C5.2 C6.2 C7.2 C8.2 C9.2 C10.2 C11.2 C12.2 C13.2 C14.2 C15.2 C16.2 C17.2 C18.2 C19.2 C20.2 C21_PBS1.2 C21_PBS2.2 D2.2 D3.1 J1.1 J1.2 J1.3 J1.4 J1.C1 J1.C6 J3.2 J4.3 J4.5 LS1.2 PB1_PB1.1 PB1_PB2.1 PB1_PB3.1 PB1_PB4.1 PB1_PB5.1 PB1_PB6.1 PB1_PB7.1 PB1_PB8.1 PB1_PB9.1 PB1_PB10.1 PB2_PBS1.1 PB2_PBS2.1 R2.1 R3.1 R5.2 R9.1 R18.1 R19.1 R20.1 R21.2 R22.1 R23.1 R26.2 TP5.0 U1.8 U1.23 U1.35 U1.47 U2.4 U3.6 U3.8 U3.17 U4.2 | length 82.4
  Top Layer w0.152: C12.2 4.988,12.25 6.44,12.25 C11.2 7.841,12.281 U2.4 ; v1(46.303,34.892) 46.303,34.14 C14.2 ; v1(47.87,34.858) 47.876,34.852 R22.1 ; v1(47.98,36.817) 48.334,36.817 J1.C6 ; C19.2 50.723,27.004 50.741,27.022 C17.2 ; J1.C1@54.296,36.917 54.436,36.777 v1(55.556,36.777) ; J1.C1 J1.C1@54.408,36.805 ; R5.2@70.875,37.896 R5.2 ; R5.2@70.942,37.829 v1(72.112,37.829) ; v1(76.338,16.19) 77.741,16.19 R26.2 ; D3.1 79.728,14.965 79.817,15.054 v1(79.817,16.124) ; TP5.0 94.493,6.896 94.493,5.571 v1(94.543,5.521)
  Top Layer w0.203: v1(11.609,12.409) 11.609,13.76 11.647,13.799 C1_PB3.2 ; D2.2 12.322,3.533 v1(14.023,3.533) ; PB1_PB3.1 12.261,22.912 v1(12.261,24.022) ; v1(19.353,4.784) C1_PB4.2 ; C21_PBS2.2 19.543,36.474 v1(19.543,37.178) ; v1(19.968,23.925) 20.843,23.925 C1_PB1.2 ; PB1_PB4.1 21.687,13.984 v1(22.027,14.324) ; PB1_PB1.1 21.379,33.059 v1(21.395,33.074) ; v1(23.668,16.208) 24.622,16.208 C1_PB2.2 ; PB1_PB2.1 30.088,23.114 30.137,23.162 30.636,23.162 30.755,23.281 v1(30.928,23.281) ; v1(43.138,36.83) 43.138,35.836 R21.2 ; U3.6@43.686,28.495 U3.6 43.637,29.972 43.684,30.019 43.709,29.993 v1(43.887,29.993) 44.611,29.27 44.611,28.57 U3.8 ; C13.2 44.761,34.128 v1(44.761,34.883) ; v1(47.522,9.263) 47.533,9.263 47.556,9.24 47.573,9.258 C1_PB6.2 ; U4.2 v1(49.729,29.638) ; PB1_PB6.1 49.303,18.503 49.307,18.506 49.838,18.506 50.259,18.926 v1(50.334,18.926) ; C19.2 v1(52.091,25.472) ; C16.2 v1(51.754,32.533) ; C18.2@50.783,34.083 50.826,34.04 v1(51.821,34.04) ; C20.2 52.959,29.021 v1(54.21,29.021) ; v1(63.141,9.323) 64.132,9.323 C1_PB5.2 ; v1(64.617,19.815) 64.649,19.783 PB1_PB5.1 ; v1(66.081,28.734) 66.198,28.734 66.401,28.938 C5.2 C5.2@67.547,29.118 ; v1(66.309,32.091) 67.452,32.091 C9.2 C9.2@67.536,32.152 ; v1(66.462,29.877) 66.579,29.877 66.876,30.175 67.364,30.175 67.547,30.358 C6.2 C6.2@67.536,30.549 ; C10.2 67.564,33.777 v1(67.564,34.888) ; U1.8@70.48,29.669 U1.8 72.485,29.635 v1(72.582,29.539) ; v1(72.939,35.973) 72.957,35.955 72.957,34.653 U1.47 ; U1.23 77.475,26.496 77.581,26.602 77.581,26.832 77.722,26.974 79.822,26.974 v1(79.97,26.826) ; v1(79.04,11.467) 79.04,10.384 R9.1 ; U1.35 82.281,32.635 82.874,33.228 C4.2 84.483,33.408 v1(84.56,33.485) ; C8.2 80.994,24.061 v1(82.362,24.061) ; C7.2 80.943,25.534 v1(82.362,25.534) ; C3.2 v1(84.329,35.06) ; PB1_PB7.1 89.209,23.916 89.198,23.928 89.198,24.184 v1(89.216,24.202) ; C1_PB7.2 91.776,13.69 v1(92.937,13.69) ; C21_PBS1.2 99.709,38.629 101.128,38.629 v1(101.18,38.576) ; PB1_PB10.1 102.556,33.349 v1(102.556,34.436) ; PB1_PB8.1 103.833,5.039 v1(103.849,5.023) ; C1_PB8.2@104.27,13.946 104.397,13.819 v1(105.337,13.819) ; C1_PB8.2 C1_PB8.2@104.299,13.918 ; C1_PB10.2 105.128,24.017 105.128,22.744 v1(105.111,22.726) ; PB1_PB9.1 116.087,23.625 116.071,23.64 116.071,23.975 v1(116.103,24.007) ; C1_PB9.2 118.586,13.278 v1(119.787,13.278)
  Top Layer w0.254: C2.2@79.052,4.881 J4.3@79.052,6.005
  Top Layer w0.305: v1(45.295,36.937) 45.298,36.94 R2.1 R2.1@45.319,37.966 ; J1.2@46.722,37.966 J1.2 ; C18.2 C18.2@50.783,34.083 ; J1.1 56.748,38.007 J1.1@56.758,37.997 ; R3.1@58.062,37.997 R3.1 58.072,36.965 v1(58.094,36.943)
  other v1: 37.602,29.255 37.564,33.415
NetC11_1: C11.1 C12.1 Q2.2 U2.5 | length 16.3
  Top Layer w0.203: C12.1 4.946,13.79 5.081,13.656 5.22,13.795 6.471,13.795 U2.5
  Top Layer w0.254: Q2.2 2.997,22.949 2.997,21.788 9.376,15.409 cw(c9.196,15.23) 9.45,15.23 9.45,14.483 cw(c9.196,14.483) 9.377,14.304 U2.5
NetD1_1: D1.1 Q1.1 R4.1 | length 6.8
  Top Layer w0.203: D1.1 62.823,37.868 63.022,37.67 Q1.1 65.247,37.745 69.402,37.745 R4.1
NetD2_1: D2.1 R14.1 | length 1.5
  Top Layer w0.2: R14.1 12.23,5.096 D2.1
NetD3_3: D3.3 LS1.1 Q3.3 R26.1 | length 9.2
  Top Layer w0.203: R26.1 80.601,17.721 80.67,17.721 D3.3 ; 80.601,18.981 80.601,17.806 80.639,17.767 D3.3 ; v1(82.933,17.668) 80.739,17.668 D3.3
  Top Layer w0.254: 80.601,18.981 80.601,19.408 Q3.3
  Bottom Layer w0.203: LS1.1 81.437,17.307 81.798,17.668 v1(82.933,17.668)
NetF1_1: F1.1 J1.C2 J1.C5 | length 8.6
  Top Layer w0.508: J1.C5 50.138,36.233 50.264,36.107 50.264,35.395 50.692,34.967 53.195,34.967 ; J1.C2 53.195,36.226 53.195,34.967 ; F1.1 55.12,33.553 53.707,34.967 53.195,34.967
NetF2_1: F2.1 J3.1 | length 5.6
  Top Layer w0.762: J3.1 59.139,30.527 F2.1
NetF2_2: F2.2 J2.1 | length 3.8
  Top Layer w0.508: F2.2 59.368,33.532 F2.2@59.416,33.58
  Top Layer w0.762: F2.2@59.416,33.58 59.465,33.532 61.573,33.532 62.541,32.564 J2.1
NetJ1_C3: J1.C3 R3.2 | length 8.4
  Top Layer w0.203: J1.C3 52.158,38.091 53.504,39.437 57.997,39.437 58.072,39.512 R3.2
NetJ1_C4: J1.C4 R2.2 | length 8.4
  Top Layer w0.203: R2.2@45.298,39.512 45.373,39.437 49.849,39.437 51.158,38.128 J1.C4
  Top Layer w0.254: R2.2 R2.2@45.298,39.512
NetJ2_2: J2.2 Q1.3 | length 9
  Top Layer w0.508: J2.2 62.551,30.319 62.969,30.737 62.969,30.799 65.218,33.048 65.218,34.216 67.722,36.72 Q1.3
NetLED1_1: LED1.1 R15.2 | length 1.5
  Top Layer w0.203: LED1.1 45.568,25.103 R15.2
NetLED1_2: LED1.2 U3.9 | length 2.7
  Top Layer w0.203: U3.9 45.414,29.243 45.462,29.195 LED1.2 LED1.2@45.512,26.711
NetLED2_1: LED2.1 R17.2 | length 1.5
  Top Layer w0.203: R17.2 43.811,25.091 LED2.1
NetQ2_1: Q2.1 R13.1 | length 2.9
  Top Layer w0.254: Q2.1 3.771,24.976 3.932,25.137 3.932,26.733 R13.1
NetQ2_3: Q2.3 R11.1 R12.1 | length 4.1
  Top Layer w0.254: Q2.3 5.821,24.026 6.576,23.271 6.854,23.271 7.002,23.123 R12.1 R11.1
NetQ3_1: Q3.1 R10.1 R25.1 | length 6
  Top Layer w0.203: R25.1@78.274,20.774 78.349,20.849 80.443,20.849 81.626,22.033 Q3.1
  Top Layer w0.254: R10.1 76.496,20.793 76.562,20.858 78.036,20.858 R25.1 78.199,20.849 R25.1@78.274,20.774
NetR4_2: R4.2 R5.1 | length 1.6
  Top Layer w0.203: R4.2 69.477,36.296 69.552,36.371 R5.1
NetR14_2: R14.2 U2.1 | length 1.9
  Top Layer w0.2: U2.1 8.873,3.64 10.741,3.64 R14.2
NetR16_2: R16.2 U3.5 | length 3.4
  Top Layer w0.203: R16.2 40.497,26.924 40.671,27.098 41.195,27.098 42.573,28.476 43.089,28.476 43.137,28.525 U3.5
NetR20_2: R20.2 U3.1 | length 2.2
  Top Layer w0.203: R20.2 40.915,31.34 41.512,30.743 U3.1
NetR21_1: R21.1 U3.14 | length 3.3
  Top Layer w0.203: R21.1 43.229,34.346 43.403,34.173 43.403,33.921 43.918,33.406 43.918,32.332 44.089,32.161 44.089,31.492 U3.14
NetR22_2: R22.2 U3.12 | length 3.3
  Top Layer w0.203: U3.12 45.386,30.792 45.893,30.792 47.701,32.6 R22.2
NetR23_2: R23.2 U3.16 | length 3.8
  Top Layer w0.203: R23.2 42.719,32.813 43.137,32.394 U3.16
PGOOD: LED2.2 U1.10 U3.7 | length 33.3
  Top Layer w0.152: LED2.2 43.978,26.711 44.619,26.069 44.619,24.347 v1(44.598,24.326) ; v1@44.619,24.326 44.721,24.224 45.081,24.224 45.246,24.059 66.399,24.059 69.819,27.48 69.819,28.035 70.289,28.504 70.365,28.504 70.399,28.504 70.53,28.635 U1.10
  Top Layer w0.203: LED2.2 44.137,26.92 U3.7
SNES_AUX_PB1: C21_PBS1.1 PB2_PBS1.2 R24_PBS1.1 U1.32 | length 36
  Top Layer w0.203: U1.32 91.012,31.135 97.093,37.216 R24_PBS1.1 99.641,37.216 C21_PBS1.1 107.544,37.201 PB2_PBS1.2
SNES_AUX_PB2: C21_PBS2.1 PB2_PBS2.2 R24_PBS2.1 U1.33 | length 78.7
  Top Layer w0.203: PB2_PBS2.2 14.872,34.936 R24_PBS2.1 19.486,34.936 C21_PBS2.1 C21_PBS2.1@19.59,34.896 ; v1(74.404,28.842) 74.494,28.932 75.585,28.932 78.288,31.635 U1.33
  Bottom Layer w0.203: PB2_PBS2.2 13.7,33.494 13.974,33.22 14.07,33.22 20.386,26.904 74.086,26.904 74.646,27.464 74.646,27.967 74.418,28.195 74.418,28.829 v1(74.404,28.842)
SNES_PB1: C1_PB1.1 PB1_PB1.2 R1_PB1.1 U1.11 | length 56.3
  Top Layer w0.203: PB1_PB1.2@22.325,25.445 22.325,23.923 C1_PB1.1 ; R1_PB1.1 22.334,23.883 22.34,23.889 22.35,23.889 33.31,23.889 35.445,21.754 38.409,21.754 40.397,23.742 66.581,23.742 70.137,27.297 70.137,27.888 70.278,28.029 70.424,28.029 70.53,28.135 U1.11
  Top Layer w0.254: PB1_PB1.2@22.325,25.445 22.347,25.467 22.347,25.812 PB1_PB1.2 22.37,26.103 PB1_PB1.2@22.348,26.125
SNES_PB2: C1_PB2.1 PB1_PB2.2 R1_PB2.1 U1.12 | length 51.2
  Top Layer w0.203: R1_PB2.1 26.25,17.56 26.325,17.485 26.25,17.41 26.25,16.357 C1_PB2.1 26.208,16.345 26.416,16.554 30.057,16.554 30.312,16.809 33.949,16.809 40.539,23.399 66.723,23.399 70.479,27.155 70.479,27.585 70.53,27.635 U1.12
SNES_PB3: C1_PB3.1 PB1_PB3.2 R1_PB3.1 U1.13 | length 67
  Top Layer w0.203: C1_PB3.1 13.205,13.817 R1_PB3.1@13.205,15.167 ; PB1_PB3.2 13.225,16.765 13.225,15.362 R1_PB3.1 R1_PB3.1@13.205,15.167 ; U1.13 69.973,26.135 66.894,23.057 40.702,23.057 32.639,14.993 13.379,14.993 R1_PB3.1@13.205,15.167
SNES_PB4: C1_PB4.1 PB1_PB4.2 R1_PB4.1 U1.14 | length 62.5
  Top Layer w0.203: C1_PB4.1 22.074,4.86 R1_PB4.1@22.074,6.296 ; R1_PB4.1 21.999,6.471 22.074,6.546 22.124,6.595 22.173,6.644 22.487,6.644 30.47,14.627 32.757,14.627 40.844,22.714 67.036,22.714 69.407,25.084 72.68,25.084 72.966,25.37 72.966,26.127 U1.14 ; R1_PB4.1@22.074,6.644 22.074,6.746
  Top Layer w0.254: PB1_PB4.2 22.059,6.761 22.074,6.746
SNES_PB5: C1_PB5.1 PB1_PB5.2 R1_PB5.1 U1.15 | length 23.7
  Top Layer w0.203: C1_PB5.1 65.64,9.35 R1_PB5.1@65.64,10.893 ; PB1_PB5.2 65.64,11.045 R1_PB5.1@65.64,10.893 ; U1.15 73.475,15.141 69.211,10.878 R1_PB5.1 65.648,10.886 R1_PB5.1@65.64,10.893
SNES_PB6: C1_PB6.1 PB1_PB6.2 R1_PB6.1 U1.16 | length 42.4
  Top Layer w0.203: C1_PB6.1@50.133,9.258 50.296,9.095 50.296,8.277 50.934,7.639 66.595,7.639 73.975,15.019 U1.16 ; C1_PB6.1 50.249,9.296 50.249,9.45 50.249,10.766 50.249,12.086 50.266,12.103 50.249,12.12 PB1_PB6.2 ; R1_PB6.1 R1_PB6.1@50.321,10.766
SNES_PB7: C1_PB7.1 PB1_PB7.2 R1_PB7.1 U1.17 | length 30.7
  Top Layer w0.203: U1.17 74.475,15.018 75.905,13.588 C1_PB7.1 90.2,13.594 90.2,15.112 90.2,16.626 PB1_PB7.2@90.231,16.657
  Top Layer w0.254: PB1_PB7.2 90.2,16.68 90.223,16.657 PB1_PB7.2@90.231,16.657
SNES_PB8: C1_PB8.1 PB1_PB8.2 R1_PB8.1 U1.29 | length 33.5
  Top Layer w0.203: U1.29 90.755,29.635 102.76,17.631 102.76,15.615 102.721,15.576 R1_PB8.1 102.796,13.867 C1_PB8.1 102.843,13.821 PB1_PB8.2
SNES_PB9: C1_PB9.1 PB1_PB9.2 R1_PB9.1 U1.30 | length 47.4
  Top Layer w0.203: U1.30 90.847,30.135 103.89,17.092 113.804,17.092 116.07,14.826 R1_PB9.1 ; PB1_PB9.2 117.069,16.737 117.069,14.839 117.082,14.826 117.06,14.804 117.06,13.324 C1_PB9.1
SNES_PB10: C1_PB10.1 PB1_PB10.2 R1_PB10.1 U1.31 | length 30
  Top Layer w0.203: U1.31 90.987,30.635 97.545,24.077 C1_PB10.1 103.538,24.127 103.538,25.655 PB1_PB10.2
SWCLK: J4.4 R9.2 U1.37 | length 30.5
  Top Layer w0.203: 78.158,34.884 78.211,34.937 v1(78.878,34.937) ; J4.4 79.04,8.894 R9.2
  Bottom Layer w0.203: v1(78.878,34.937) 78.113,34.172 78.113,8.305 J4.4
SWDIO: J4.2 R6.1 U1.34 | length 31.1
  Top Layer w0.203: U1.34@79.477,32.133 80.95,32.133 81.28,31.804 v1(81.315,31.804) ; J4.2 80.31,8.766 80.458,8.914 R6.1
  Bottom Layer w0.203: J4.2 78.456,9.232 78.456,30.759 79.418,31.721 81.232,31.721 v1(81.315,31.804)
SWO: J4.6 R8.1 U1.39 | length 31.8
  Top Layer w0.203: U1.39 76.975,35.574 77.286,35.885 v1(77.286,35.922) ; R8.1 77.622,8.889 77.77,8.741 J4.6
  Bottom Layer w0.203: v1(77.286,35.922) 77.286,35.867 77.77,35.382 J4.6
TDI: J4.8 R7.1 U1.38 | length 30.2
  Top Layer w0.203: R7.1 76.229,8.876 76.403,8.703 76.403,7.475 J4.8 ; v1(76.637,33.423) 76.73,33.516 76.946,33.516 77.424,33.994 77.424,34.585 U1.38
  Bottom Layer w0.203: J4.8 77.428,8.305 77.428,32.612 76.637,33.402 v1(76.637,33.423)
V_BAT: C15.1 D1.3 Q1.2 TP4.0 U3.2 U3.3 | length 40.5
  Top Layer w0.254: TP4.0 37.951,37.521 39.426,37.521 v1(39.468,37.563) ; C15.1 40.59,29.971 v1(41.477,29.971) v1@41.594,29.971 ; U3.3 42.414,29.766 41.798,29.766 v1@41.594,29.971 ; U3.2 42.414,30.22 41.843,30.22 v1@41.594,29.971 ; D1.3@61.7,34.878 61.873,35.051 D1.3
  Top Layer w0.508: D1.3 v1(61.873,36.765) ; D1.3@61.873,35.336 62.308,35.77 Q1.2
  Bottom Layer w0.254: v1(39.468,37.563) 43.727,33.303 44.81,33.303
  Bottom Layer w0.508: v1(41.477,29.971) 44.81,33.303 58.412,33.303 v1(61.873,36.765)
V_BUS: C13.1 C14.1 F1.2 TP2.0 U3.13 | length 20.5
  Top Layer w0.508: U3.13@44.741,31.614 45.358,31.614 45.541,31.797 v1(45.589,31.797) ; C13.1 44.932,32.639 45.393,32.178 45.393,32.041 45.589,31.845 v1(45.589,31.797) ; v1@45.596,31.79 v1(45.589,31.797) ; v1@45.647,31.797 v1@45.681,31.831 ; v1@45.738,31.831 46.091,32.183 46.091,32.58 46.147,32.636 C14.1 ; TP2.0 55.73,26.087 ccw(c55.37,26.446) 55.878,26.446 v1(55.878,31.783)
  Bottom Layer w0.508: v1(45.589,31.797) 45.596,31.79 55.871,31.79 v1(55.878,31.783)
VCC: C16.1 C17.1 C18.1 C19.1 R11.2 R15.1 R16.1 R17.1 TP3.0 U3.10 U3.11 U4.1 U4.3 | length 49.4
  Top Layer w0.203: R11.2 R11.2@8.527,25.116 ; R16.1 39.047,26.256 ccw(c39.25,26.256) 39.106,26.113 39.596,25.624 ccw(c39.739,25.768) 39.617,25.605 ccw(c39.739,25.768) 39.739,25.565 40.874,25.565 40.92,25.518 v1(40.966,25.472) 41.891,26.397 R17.1@42.094,26.397 ; R15.1@46.763,26.553 R15.1 ; U4.3@48.328,28.632 48.354,28.658 U4.3
  Top Layer w0.254: R11.2@8.527,25.116 v1(9.754,25.116) 9.837,25.199 10.419,25.199 TP3.0 ; v1(48.154,25.574) C19.1@49.141,25.574
  Bottom Layer w0.203: v1(40.966,25.472) v1@41.017,25.523 ; v1@48.104,25.523 v1(48.154,25.574)
  Bottom Layer w0.254: v1(9.754,25.116) 9.871,25.116 10.227,25.472 v1(40.966,25.472) ; v1@41.017,25.523 v1@48.104,25.523
pads on no net: D1.2 D3.2 FID1.4 FID2.4 FID3.4 FID4.4 FID6.4 FID8.4 J1. J4.7 J4.9 U1.2 U1.3 U1.4 U1.5 U1.6 U1.18 U1.19 U1.20 U1.22 U1.27 U1.28 U1.40 U1.44 U1.45 U1.46 U4.4

## Polygon pours and split planes (outlines as drawn)
+3V3 on Top Layer "GND2" (solid, remove dead copper, pour order 2): -0.238,-0.099 130.572,-0.099 130.572,49.431 -0.238,49.431
VCC on Top Layer "VCC_L01_P000" (solid, remove dead copper, pour order 0): 49.51,35.401 49.51,24.578 44.418,24.578 44.418,31.803
GND on Bottom Layer "GND2" (solid, remove dead copper, pour order 1): -0.277,-0.099 130.533,-0.099 130.533,49.431 -0.277,49.431

## Keep-outs
Keep-Out Layer:
  lines w0.2: -0.382,7.932 9.76,-0.103 9.765,-0.106 59.864,-0.106 59.87,-0.098 59.87,1.851 cw(c62.366,1.786) 64.863,1.794 64.863,-0.098 64.87,-0.106 114.863,-0.106 114.868,-0.104 125.292,7.969 125.296,7.975 125.296,9.368 125.287,9.374 cw(c124.973,11.964) 125.286,14.553 125.296,14.559 125.296,34.984 125.295,34.985 ccw(c123.824,34.984) 124.264,36.387 121.263,37.328 ccw(c121.047,36.639) 120.358,36.857 119.453,34.01 98.177,40.77 98.987,43.321 ccw(c97.984,43.639) 99.037,43.639 ccw(c97.984,43.639) 97.984,44.691 91.583,44.691 ccw(c91.583,40.379) 87.271,40.379 87.271,38.676 cw(c86.365,38.676) 86.365,37.77 74.946,37.77 71.419,41.238 71.414,41.24 59.709,41.24 cw(c59.709,42.518) 58.43,42.518 58.43,43.668 ccw(c57.429,43.668) 57.429,44.67 44.817,44.67 ccw(c44.817,43.515) 43.662,43.515 43.662,42.83 cw(c42.125,42.83) 42.125,41.292 38.123,41.292 cw(c38.123,42.611) 36.805,42.611 36.805,43.391 ccw(c35.478,43.391) 35.478,44.718 26.818,44.718 ccw(c26.818,43.779) 25.927,43.483 26.786,40.895 5.583,33.856 4.7,36.514 ccw(c3.699,36.182) 3.367,37.183 0.519,36.238 ccw(c0.934,34.989) -0.382,34.99 -0.382,34.989 -0.382,14.402 -0.373,14.395 cw(c-0.015,11.823) 2.582,11.823 cw(c-0.015,11.823) -0.373,9.251 -0.382,9.245 -0.382,7.932 ; 2.799,30.293 cw(c3.865,30.293) 3.865,31.358 cw(c3.865,30.293) 4.93,30.293 cw(c3.865,30.293) 3.865,29.227 cw(c3.865,30.293) 2.799,30.293 ; 29.521,37.73 cw(c31.718,37.73) 31.718,39.928 cw(c31.718,37.73) 33.916,37.73 cw(c31.718,37.73) 31.718,35.533 cw(c31.718,37.73) 29.521,37.73 ; 56.263,15.264 cw(c57.146,15.264) 57.146,16.147 cw(c57.146,15.264) 58.029,15.264 cw(c57.146,15.264) 57.146,14.381 cw(c57.146,15.264) 56.263,15.264 ; 90.923,37.669 cw(c93.187,37.669) 93.187,39.933 cw(c93.187,37.669) 95.451,37.669 cw(c93.187,37.669) 93.187,35.405 cw(c93.187,37.669) 90.923,37.669 ; 119.878,30.303 cw(c121.01,30.303) 121.01,31.435 cw(c121.01,30.303) 122.142,30.303 cw(c121.01,30.303) 121.01,29.171 cw(c121.01,30.303) 119.878,30.303

## Other copper
Top Layer:
  region net GND: 39.497,35.017 39.497,27.753 36.576,27.753 36.576,35.017
  pour cut-out: 45.951,17.822 45.951,1.566 37.852,1.566 37.852,17.822
Bottom Layer:
  pour cut-out: 45.951,18.189 45.951,1.933 37.823,1.933 37.823,18.189

## Silkscreen, mask and mechanical layers (free items; w line width, h text height)
Top Overlay:
  text "VBAT" at 34.909,37.998 h0.6
  text "VCC" at 12.853,24.956 h0.6
  text "VBUS" at 53.885,23.653 h0.6
  text "nRST" at 71.353,5.574 h0.6
  text "3V3" at 87.556,2.946 h1.2
  text "GND" at 93.972,2.938 h1.2
  text "ENGG3800 Team 28 /  / Game Controller Unit (GCU) v3" at 27.424,2.5 h1.65
Bottom Overlay:
  lines w0.305: 37.823,1.933 39.315,1.933 40.744,1.933 43.538,1.933 45.951,1.933 45.951,18.189 37.823,18.189 37.823,1.933
  text "Current Sense" at 60.308,31.49 h0.76
  text "-" at 61.257,20.645 h2.54
  text "+" at 59.274,20.37 h2.54
  text "BATTERY" at 61.414,19.549 h0.76
  text "Antenna Keepout" at 45.951,16.157 h1.02
  text "BLT V+" at 7.1,13.549 h0.76
  text "BLT GND" at 7.124,10.983 h0.76
  text "BLT TX/ MCU RX" at 7.155,8.386 h0.76
  text "BLT RX/ MCU TX" at 7.062,5.571 h0.76
  text "Programmer" at 75.245,2.82 h0.76
Mechanical 1:
  circle w0.013: c93.187,37.669 r2.264
  circle w0.013: c3.865,30.293 r1.065
  circle w0.013: c31.718,37.73 r2.198
  circle w0.013: c57.146,15.264 r0.883
  circle w0.013: c121.01,30.303 r1.132
  circle w0.013: c98.556,110.377 r3.592
  circle w0.013: c84.973,120.738 r3.724
  circle w0.013: c102.965,120.863 r1.132
  circle w0.013: c39.101,105.824 r0.883
  circle w0.013: c71.679,110.489 r3.658
  circle w0.013: c85.275,99.945 r3.654
  circle w0.013: c31.727,106.012 r2.947
  circle w0.013: c47.118,106.067 r3.01
  circle w0.013: c13.674,128.29 r2.198
  circle w0.013: c3.538,101.494 r2.897
  circle w0.013: c-5.276,110.416 r3.004
  circle w0.013: c-14.18,120.853 r1.065
  circle w0.013: c3.848,119.466 r2.898
  circle w0.013: c12.557,110.44 r2.914
  circle w0.013: c75.143,128.229 r2.264
  lines w0.013: -18.42,99.804 ccw(c-18.059,102.383) -18.42,104.961 ; 41.819,90.461 41.819,92.41 cw(c44.322,92.346) 46.825,92.354 46.825,90.461 ; 107.244,99.927 cw(c106.928,102.523) 107.244,105.119 ; -0.375,9.245 ccw(c-0.375,9.245) -0.375,9.245 ; -0.375,9.245 ccw(c-0.015,11.823) -0.375,14.402 -0.375,34.989 ; -0.375,9.245 -0.375,7.932 9.765,-0.099 59.864,-0.099 59.864,1.851 cw(c62.366,1.786) 64.87,1.794 64.87,-0.099 114.863,-0.099 125.289,7.975 125.289,9.368 ; -0.375,34.989 ccw(c-0.375,34.989) -0.375,34.989 ; -0.375,34.989 cw(c0.934,34.989) 0.522,36.231 3.369,37.176 cw(c3.699,36.182) 4.694,36.512 5.578,33.847 26.795,40.89 25.933,43.485 cw(c26.818,43.779) 26.818,44.711 35.478,44.711 cw(c35.478,43.391) 36.798,43.391 36.798,42.611 ccw(c38.123,42.611) 38.123,41.286 42.125,41.286 ccw(c42.125,42.83) 43.669,42.83 43.669,43.515 cw(c44.817,43.515) 44.817,44.663 57.429,44.663 cw(c57.429,43.668) 58.424,43.668 58.424,42.518 ccw(c59.709,42.518) 59.709,41.233 71.414,41.233 74.943,37.764 86.365,37.764 ccw(c86.365,38.676) 87.277,38.676 87.277,40.379 cw(c91.583,40.379) 91.583,44.685 97.984,44.685 cw(c97.984,43.639) 98.981,43.323 98.168,40.765 119.458,34.002 120.364,36.855 cw(c121.047,36.639) 121.261,37.322 124.262,36.381 cw(c123.824,34.984) 125.289,34.984 125.289,14.559 ; 125.289,9.368 ccw(c125.289,9.368) 125.289,9.368 ; 125.289,9.368 ccw(c125.289,9.368) 125.289,9.368 ; 125.289,9.368 cw(c124.973,11.964) 125.289,14.559 ; 125.289,14.559 ccw(c125.289,14.559) 125.289,14.559 ; -18.42,98.492 -8.28,90.461 96.818,90.461 107.244,98.535 107.244,125.543 ccw(c105.78,125.543) 106.218,126.941 103.216,127.881 ccw(c103.002,127.198) 102.32,127.415 101.413,124.561 80.124,131.325 80.936,133.882 ccw(c79.94,134.199) 79.94,135.244 73.539,135.244 ccw(c73.539,130.938) 69.233,130.938 69.233,129.235 cw(c68.321,129.235) 68.321,128.323 56.899,128.323 53.369,131.793 41.664,131.793 cw(c41.664,133.078) 40.379,133.078 40.379,134.228 ccw(c39.384,134.228) 39.384,135.223 26.773,135.223 ccw(c26.773,134.074) 25.624,134.074 25.624,133.39 cw(c24.08,133.39) 24.08,131.845 20.079,131.845 cw(c20.079,133.171) 18.753,133.171 18.753,133.951 ccw(c17.433,133.951) 17.433,135.271 8.774,135.271 ccw(c8.774,134.338) 7.889,134.045 8.75,131.45 -12.466,124.407 -13.351,127.072 ccw(c-14.346,126.742) -14.676,127.736 -17.523,126.791 ccw(c-17.111,125.549) -18.42,125.549 -18.42,98.492
Mechanical 2:
  circle w0.013: c89.723,19.93 r3.658
  circle w0.013: c103.018,30.178 r3.724
  circle w0.013: c116.6,19.817 r3.592
  circle w0.013: c103.319,9.385 r3.654
  circle w0.013: c65.163,15.508 r3.01
  circle w0.013: c49.772,15.452 r2.947
  circle w0.013: c21.893,28.906 r2.898
  circle w0.013: c30.602,19.88 r2.914
  circle w0.013: c12.769,19.857 r3.004
  circle w0.013: c21.582,10.934 r2.897